# Altium PCB MainBoardPCB_BKP.PcbDoc (part 22 of 35)
Units mm, origin at the board's own origin, x right, y up, seen from the top; angles counter-clockwise.
Board outline 258.95 x 308.86 mm, 16 copper layers (L1, L2 (GND), L3 (Sign), L4 (GND), L5 (Sign), L6 (PWR/GND), L7(PWR/GND), L8 (Plane_GND), L9 (PWR/GND), L10 (PWR/GND), L11 (PWR/GND), L12 (Sign), L13 (GND), L14 (Sign), L15 (GND), L16), stack 2.502 mm thick; 2361 components, 1770 nets, 8410 pads, 3259 vias.
Unrouted connection lines stored in the file: 4700.
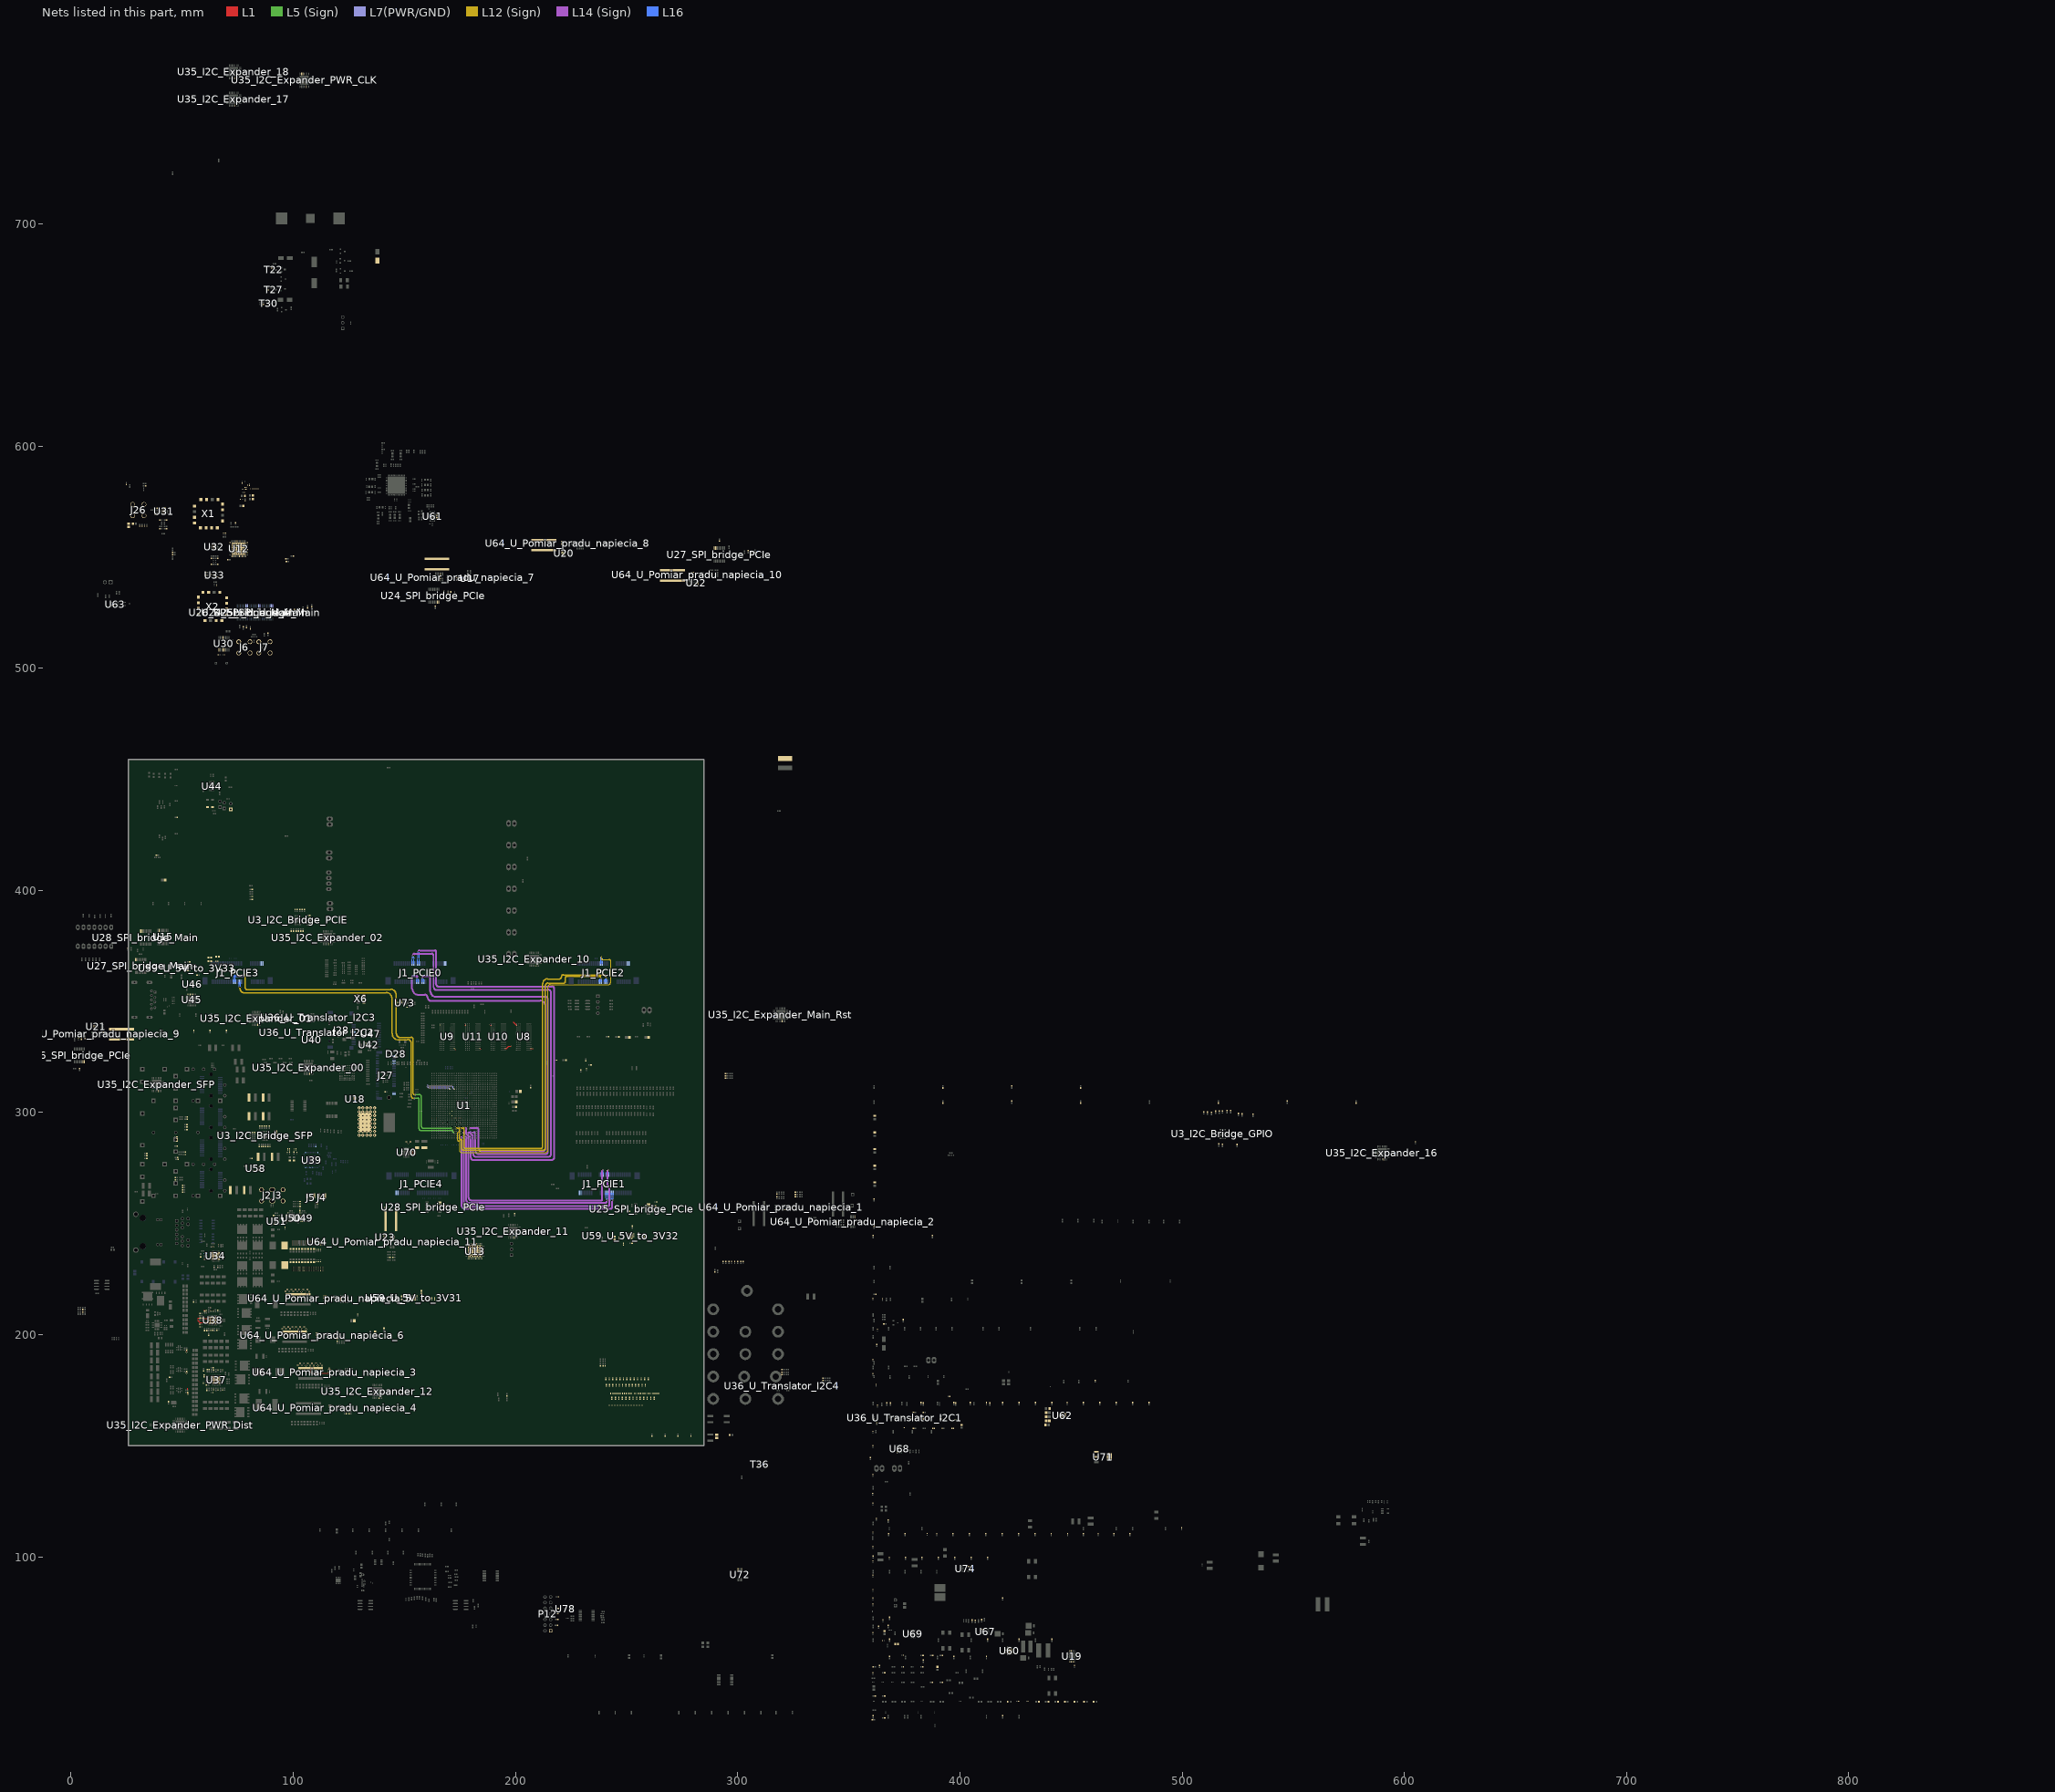
[diagram p22: the nets of this part, all layers, seen from the top]

## Via types
v1: diameter 0.5, hole 0.2, L1 to L16, tented both sides, 1212 vias
v2: diameter 0.5, hole 0.2, L1 to L16, 476 vias
v3: diameter 0.5/0.35/0.35/0.35/0.35/0.35/0.35/0.35/0.35/0.35/0.35/0.35/0.35/0.35/0.35/0.5 (per signal layer), hole 0.15, L1 to L16, tented both sides, 463 vias
v4: diameter 0.35/0/0.35 (per signal layer), hole 0.127, L1 to L3 (Sign), tented both sides, 282 vias
v5: diameter 0.5/0.35/0.35/0.35/0.35/0.35/0.35/0.35/0.35/0.35/0.35/0.35/0.35/0.35/0.35/0.5 (per signal layer), hole 0.2, L1 to L16, tented both sides, 222 vias
v6: diameter 0.8, hole 0.4, L1 to L16, tented both sides, 168 vias
v7: diameter 2.54, hole 1.02, L1 to L16, 113 vias
v8: diameter 1.4, hole 0.5, L1 to L16, tented both sides, 80 vias
v9: diameter 0.5/0/0.5 (per signal layer), hole 0.2, L14 (Sign) to L16, tented both sides, 52 vias
v10: diameter 0.35, hole 0.127, L1 to L2 (GND), tented both sides, 36 vias
v11: diameter 0.35, hole 0.127, L1 to L16, tented both sides, 16 vias
v12: diameter 0.4, hole 0.2, L1 to L16, 16 vias
v13: diameter 0.25, hole 0.2, L1 to L16, 16 vias
v14: diameter 0.3, hole 0.2, L1 to L16, 15 vias
v15: diameter 0.35/0/0.35 (per signal layer), hole 0.127, L1 to L3 (Sign), 12 vias
v16: diameter 0.45, hole 0.15, L1 to L16, 12 vias
v17: diameter 0.5/0.35/0.35/0.35/0.35/0.35/0.35/0.35/0.35/0.35/0.35/0.35/0.35/0.35/0.35/0.45 (per signal layer), hole 0.15, L1 to L16, tented both sides, 10 vias
v18: diameter 0.2/0/0.2 (per signal layer), hole 0.1, L1 to L3 (Sign), tented both sides, 9 vias
v19: diameter 0.4, hole 0.1, L1 to L16, 7 vias
v20: diameter 1.15, hole 1.15, L1 to L16, 6 vias
v21: diameter 1.65, hole 1.65, L1 to L16, 6 vias
v22: diameter 0.5, hole 0.2, L3 (Sign) to L6 (PWR/GND), tented both sides, 6 vias
v23: diameter 0.35/0/0.35 (per signal layer), hole 0.127, L14 (Sign) to L16, tented both sides, 5 vias
v24: diameter 0.2, hole 0.1, L1 to L16, 4 vias
v25: diameter 0.4, hole 0.2, L1 to L16, tented both sides, 2 vias
v26: diameter 0.4, hole 0.15, L1 to L16, 2 vias
v27: diameter 0.5/0.35/0.35/0.35/0.35/0.35/0.35/0.35/0.35/0.35/0.35/0.35/0.35/0.35/0.35/0.5 (per signal layer), hole 0.15, L1 to L16, 2 vias
v28: diameter 0.35, hole 0.127, L3 (Sign) to L6 (PWR/GND), tented both sides, 2 vias
v29: diameter 5.5, hole 3.5, L1 to L16, 1 vias
v30: diameter 0.5/0.35/0.35/0.35/0.35/0.35/0.35/0.35/0.35/0.35/0.35/0.35/0.35/0.35/0.35/0.5 (per signal layer), hole 0.2, L1 to L16, 1 vias
v31: diameter 0.35/0.35/0.35 (per signal layer), hole 0.127, L1 to L3 (Sign), tented both sides, 1 vias
v32: diameter 0.45/0/0.45 (per signal layer), hole 0.15, L1 to L3 (Sign), tented both sides, 1 vias
v33: diameter 0.45/0/0.45 (per signal layer), hole 0.2, L14 (Sign) to L16, tented both sides, 1 vias
v34: diameter 0.35, hole 0.127, L2 (GND) to L3 (Sign), 1 vias
v35: diameter 0.35, hole 0.127, L1 to L2 (GND), 1 vias

## Nets (pads, with @x,y where several pads share a name; then routed paths per layer and width w, separated by ;. In a path a pad name is that pad's centre, name@x,y a point inside that pad or via, vN(x,y) a via of type N, cw(c..) or ccw(c..) an arc to the next point about the centre after c; other vN are vias at no path point) (continued)
B224_Rx3_P: (continued)
  L12 (Sign) w0.073: v1(78.837,362.522) ccw(c78.837,362.321) 78.637,362.321 78.637,355.867 ccw(c78.996,355.867) 78.996,355.507 143.84,355.507 cw(c143.84,352.866) 146.482,352.866 146.482,335.47 ccw(c148.048,335.47) 148.048,333.904 153.039,333.904 cw(c153.039,332.778) 154.165,332.778 154.165,308.429 ccw(c154.432,308.429) 154.432,308.162 154.662,308.162 ccw(c154.662,308.362) v1(154.862,308.362)
  L16 w0.081: J1_PCIE3.25@73.985,358.792 73.985,359.725 ccw(c73.877,359.725) 73.877,359.832 73.877,361.111 cw(c74.068,361.111) 74.068,361.302 78.005,361.302 ccw(c78.005,362.128) 78.83,362.128 78.83,362.522 v1(78.837,362.522)
B224_Tx0_to_C_N: C280.1 J1_PCIE2.26 | length 2.2
  L16 w0.081: J1_PCIE2.26@238.29,366.992 238.397,367.099 238.397,368.967 C280.1@238.29,369.075
B224_Tx0_to_C_P: C279.1 J1_PCIE2.24 | length 2.2
  L16 w0.081: J1_PCIE2.24@239.09,366.992 238.982,367.099 238.982,368.967 C279.1@239.09,369.075
B224_Tx0C_to_B_N: C280.2 U1.N3 | length 169.5
  L12 (Sign) w0.073: v3(174.397,290.539) 174.397,290.698 ccw(c174.155,290.698) 174.155,290.939 ccw(c174.155,290.774) 173.99,290.774 173.99,287.539 ccw(c174.332,287.539) 174.332,287.198 174.634,287.198 cw(c174.634,286.74) 175.091,286.74 175.091,282.464 ccw(c175.539,282.464) 175.539,282.016 213.373,282.016 ccw(c213.373,283.248) 214.605,283.248 214.605,356.464 cw(c215.697,356.464) 215.697,357.556 241.795,357.556 ccw(c241.795,358.635) 242.875,358.635 242.875,368.109 ccw(c242.16,368.109) 242.16,368.824 239.208,368.824 cw(c239.208,369.443) 238.59,369.443 238.59,370.177 ccw(c238.397,370.177) v11(238.397,370.37)
  L16 w0.081: C280.2@238.29,369.595 238.29,369.678 cw(c238.397,369.678) 238.397,369.785 v11(238.397,370.37)